# Altium PCB ELF 2 & ELF 2_Lite V1.3.PcbDoc (part 8 of 8)
Units mm, origin at the board's own origin, x right, y up, seen from the top; angles counter-clockwise.
Board outline 120 x 75 mm, 4 copper layers (01 TOP, 02 GND, 03 Signal, 04 BOT), stack 0.603 mm thick; 470 components, 412 nets, 2075 pads, 1565 vias.
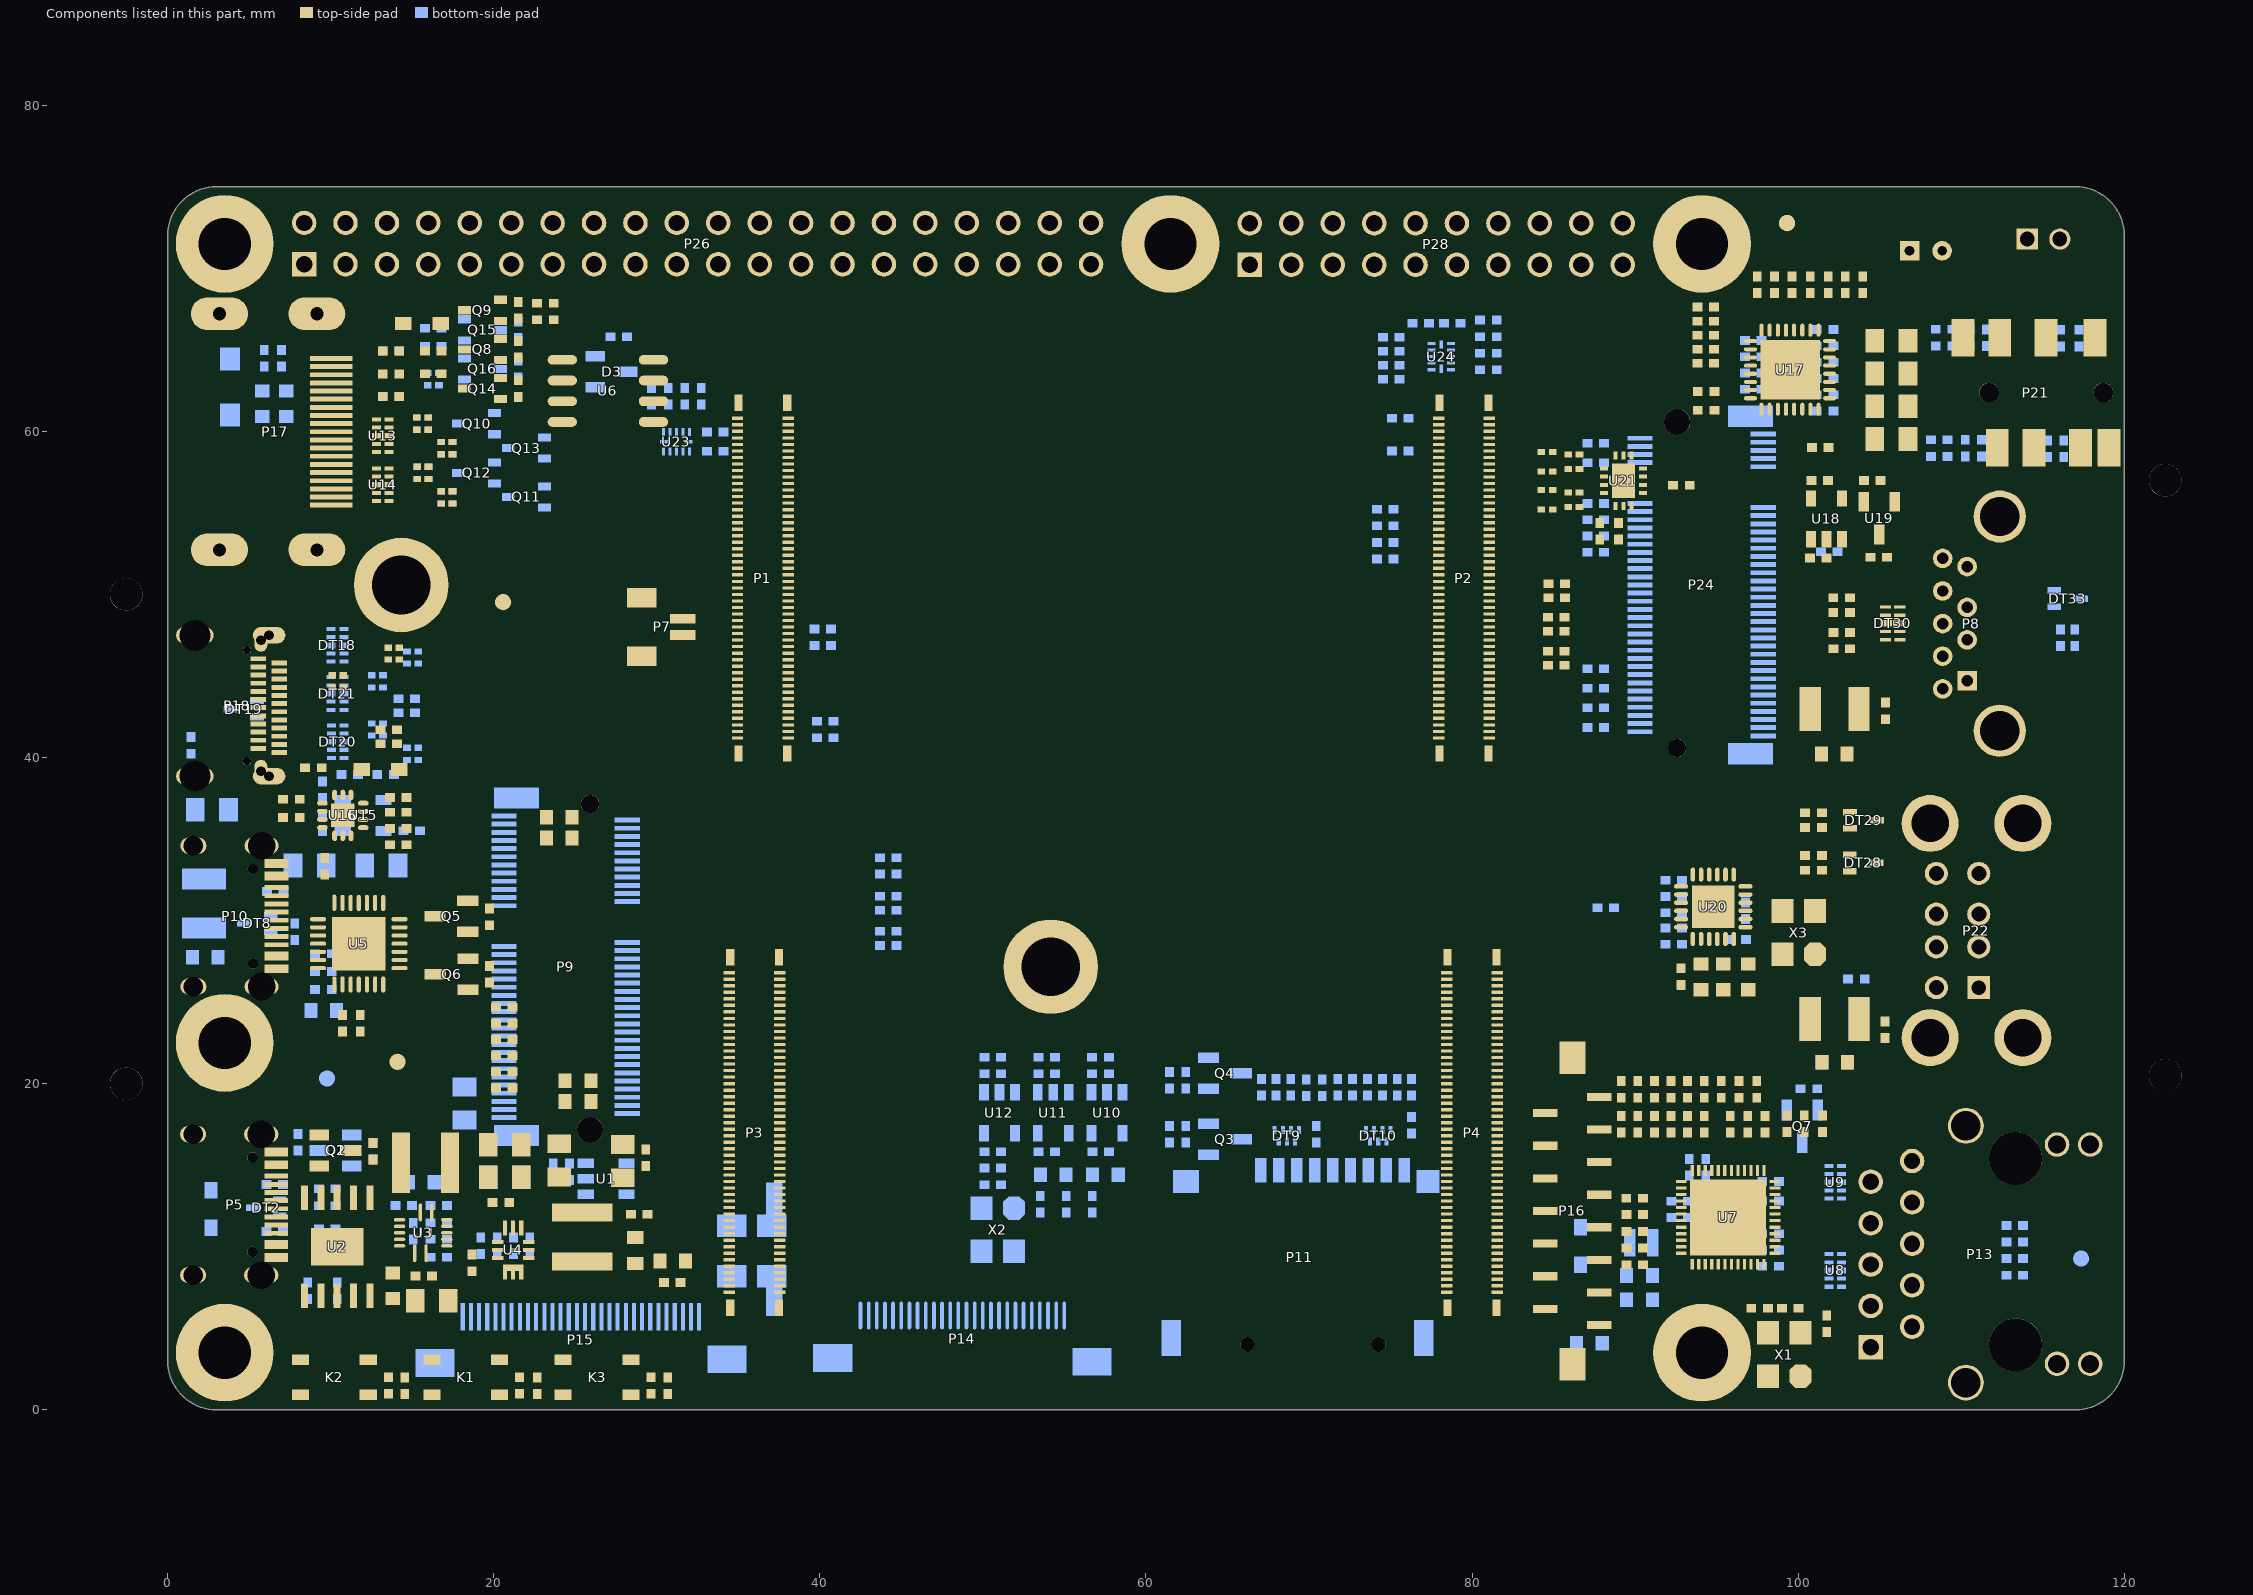
[diagram p9: the components of this part, seen from the top]

## Other copper (continued)
04 BOT:
  pour cut-out: 12.309,47.398 12.861,46.846 16.78,46.846 18.813,44.814 18.813,44.255 18.592,44.255 17.227,42.889 17.227,39.935 16.721,39.43 8.81,39.43 7.843,40.396 3.799,40.396 3.514,40.681 3.514,41.343 4.698,42.527 4.698,43.248 3.577,44.369 3.577,45.43 4.04,45.894 6.241,45.894 8.119,47.772 11.749,47.772
  pour cut-out: 41.219,4.784 50.49,4.784 50.49,6.943 48.458,8.975 48.458,11.896 47.442,12.912 47.442,15.833 46.807,16.468 45.029,16.468 41.219,12.658 41.219,6.308
  pour cut-out: 51.049,50.509 51.049,44.89 51.181,44.758 51.897,44.758 52.013,44.874 52.013,50.278 51.933,50.684 51.224,50.684
  pour cut-out: 87.663,67.495 87.17,67.987 86.873,67.987 85.451,66.566 85.451,63.489 87.663,65.7
  pour cut-out: 77.477,12.589 76.982,12.094 76.982,6.955 77.498,6.439 78.165,7.105 78.165,12.256 77.832,12.589
  pour cut-out: 21.703,59.009 21.703,58.701 22.527,57.877 23.614,57.877 23.801,58.064 23.801,59.07 23.698,59.172 21.867,59.172
  pour cut-out: 94.839,23.542 96.846,23.542 96.929,23.458 96.924,23.453 94.948,23.453
  pour cut-out: 6.25,12.483 6.25,12.29 7.269,12.29 7.269,12.419 7.204,12.483
  pour cut-out: 9.557,27.502 9.557,23.988 9.396,23.827 9.396,27.501 9.405,27.51
  pour cut-out: 6.953,29.727 6.953,29.92 6.128,29.92 6.128,29.744 6.145,29.727
  pour cut-out: 41.88,37.46 41.88,36.388 41.807,36.315 41.602,36.52 41.602,37.181
  pour cut-out: 59.309,14.986 59.309,8.89 55.118,4.699 54.61,4.699 54.61,6.731 58.674,10.795 58.674,14.986
  pour cut-out: 53.721,16.256 53.721,14.986 53.848,14.986 53.848,16.256
  pour cut-out: 53.863,17.667 54.756,17.667 54.756,17.291 54.737,17.272 53.955,17.272 53.863,17.365
  pour cut-out: 55.763,17.667 56.156,17.667 56.156,16.26 55.763,16.26
  pour cut-out: 54.356,12.7 54.356,10.922 55.88,10.922 55.88,12.7
  pour cut-out: 77.851,63.5 78.359,63.5 78.359,64.897 77.851,64.897
  pour cut-out: 30.099,59.563 30.099,59.182 31.496,59.182 31.496,59.563
  pour cut-out: 33.579,60.579 33.579,58.039 33.401,58.039 33.401,60.579
  pour cut-out: 34.036,27.559 35.687,25.908 35.687,25.4 35.306,25.019 34.925,25.019 33.274,26.67 33.274,27.432 33.401,27.559
  pour cut-out: 21.59,38.735 21.717,38.862 24.13,38.862 24.257,38.735 24.257,37.211 22.86,35.814 21.59,35.814
  pour cut-out: 22.352,23.622 22.352,23.114 22.987,23.114 22.987,23.622
  pour cut-out: 21.59,25.908 22.225,25.908 22.225,24.892 21.59,24.892
  pour cut-out: 43.195,34.29 45.293,34.29 45.293,28.194 43.195,28.194
  pour cut-out: 19.812,17.526 21.59,17.526 21.59,36.83 19.812,36.83
  pour cut-out: 80.097,55.372 80.097,54.239 80.061,54.204 82.042,54.204 82.042,55.346 82.017,55.372
  pour cut-out: 80.007,62.048 78.601,60.642 78.843,60.4 81.665,60.4 82.392,61.127 82.392,62.048
  pour cut-out: 75.361,66.777 75.361,65.974 75.555,65.78 76.206,65.78 76.206,66.919 75.855,67.27
  pour cut-out: 73.484,65.666 73.484,61.48 73.702,61.48 74.301,62.079 74.301,65.37 74.031,65.64
  pour cut-out: 10.87,6.274 10.856,6.259 10.856,6.118
  pour cut-out: 13.175,11.25 13.175,9.37 13.518,9.026 14.165,9.026 14.495,9.356 16.124,9.356 16.124,11.134 16.048,11.21
  pour cut-out: 15.749,14.607 13.5,14.607 13.482,14.588 13.5,14.571 15.733,14.571
  pour cut-out: 24.709,11.439 25.034,11.114 25.06,11.114
  pour cut-out: 98.653,60.077 98.653,58.662 98.598,58.607 96.083,58.607 96.032,58.657 96.032,59.978 96.134,60.08
  pour cut-out: 96.872,41.977 98.828,41.977 98.828,41.081 96.87,41.081
  pour cut-out: 46.604,48.955 47.594,48.955 47.594,48.904 46.604,48.904
  pour cut-out: 32.715,2.458 33.056,2.117 42.108,2.117 42.108,4.911 32.837,4.911 32.71,4.784
  pour cut-out: 54.46,4.179 54.554,4.085 54.554,1.609 57.962,1.609 58.552,2.199 58.552,4.088 58.491,4.149
  pour cut-out: 52.013,48.447 51.023,48.447
  pour cut-out: 33.726,49.996 33.726,45.678 39.06,45.678 38.986,45.752 38.986,50.049
  pour cut-out: 82.494,15.96 85.161,13.293 84.018,12.15 84.018,5.927 79.827,5.927 78.811,6.943 78.811,13.674 81.097,15.96
  pour cut-out: 89.733,4.403 89.733,5.292 89.479,5.292 89.479,4.403
  pour cut-out: 88.336,13.293 88.336,11.007 89.733,12.404 89.733,14.563
  pour cut-out: 17.978,4.784 32.837,4.784 32.837,8.721 23.185,8.721 21.026,6.562 17.978,6.562
  pour cut-out: 69.794,18.373 69.794,16.849 71.191,16.849 71.191,18.373
  pour cut-out: 73.604,17.992 73.604,16.849 74.366,16.849 74.366,17.992

## Silkscreen, mask and mechanical layers (free items; w line width, h text height)
Top Overlay:
  drawing of 2779 lines, arcs and shapes, not listed
  text "L_SPK" at 111.993,67.966 h0.76
  text "R_SPK" at 114.803,67.96 h0.76
  text "HDMI" at 0.27,50.213 h1.52
  text "USB-DP" at 0.266,48.271 h1.52
  text "ELF 2 & ELF 2_Lite" at 86.973,41.974 h1.5
  text "V1.3" at 96.229,40.023 h1.5
  text "DEBUG" at 0.263,35.366 h1.52
  text "MIPI CSI" at 83.739,23.846 h1.27
  text "PWR" at 0.259,17.616 h1.52
  text "RST" at 9.431,3.997 h1.02
  text "BOOT" at 17.089,3.997 h1.02
  text "RECOVERY" at 23.947,3.997 h1.02
Bottom Overlay:
  drawing of 2763 lines, arcs and shapes, not listed
  text "ELF 2 & ELF 2_Lite" at 75.391,26.174 h1.5
  text "V1.3" at 70.776,24.275 h1.5
  text "TF CARD" at 72.248,21.544 h1.27
  text "MIPI DSI" at 30.682,8.837 h1.27
  text "MIPI CSI" at 48.347,8.837 h1.27

## Text inside footprints (layer, text, board x,y; h text height)
M15: Bottom Overlay "QR Code" at 87.345,17.484 h0.76
M18: Top Overlay "QR Code" at 24.324,26.545 h0.76
P9: Bottom Overlay "1" at 19.354,36.536 h0.8 r90; Bottom Overlay "2" at 30.479,36.461 h0.8 r90; Bottom Overlay "74" at 30.479,18.411 h0.8 r90
P21: Mechanical 13 "此线段与板边重合" at 126.665,58.323 h0.76 r180
P24: Bottom Overlay "1" at 99.125,41.205 h0.8 r270; Bottom Overlay "2280" at 18.225,48.78 h2 r270
P26: Top Overlay "40" at 58.013,73.761 h1.5; Top Overlay "1" at 6.244,68.995 h1.5; Top Overlay "2" at 6.102,73.491 h1.5; Top Overlay "39" at 58.003,68.152 h1.5
P28: Top Overlay "20" at 90.688,73.761 h1.5; Top Overlay "19" at 90.613,68.173 h1.5; Top Overlay "2" at 64.217,73.669 h1.5; Top Overlay "1" at 64.232,68.348 h1.5
U20: Mechanical 46 "5" at 96.661,31.594 h0.25 r180; Mechanical 46 "4" at 96.661,31.094 h0.25 r180; Mechanical 46 "7" at 95.936,32.82 h0.25 r180; Mechanical 46 "16" at 92.609,30.594 h0.25 r180; Mechanical 46 "17" at 92.609,30.094 h0.25 r180; Mechanical 46 "10" at 94.334,32.82 h0.25 r180; Mechanical 46 "19" at 93.334,28.869 h0.25 r180; Mechanical 46 "9" at 94.936,32.82 h0.25 r180; Mechanical 46 "18" at 92.609,29.594 h0.25 r180; Mechanical 46 "20" at 93.834,28.869 h0.25 r180; Mechanical 46 "2" at 96.661,30.094 h0.25 r180; Mechanical 46 "23" at 95.334,28.869 h0.25 r180; Mechanical 46 "22" at 94.834,28.869 h0.25 r180; Mechanical 46 "13" at 92.609,32.094 h0.25 r180; Mechanical 46 "6" at 96.661,32.094 h0.25 r180; Mechanical 46 "11" at 93.834,32.82 h0.25 r180; Mechanical 46 "1" at 96.661,29.594 h0.25 r180; Mechanical 46 "8" at 95.436,32.82 h0.25 r180; Mechanical 46 "21" at 94.334,28.869 h0.25 r180; Mechanical 46 "24" at 95.834,28.869 h0.25 r180; Mechanical 46 "15" at 92.609,31.094 h0.25 r180; Mechanical 46 "12" at 93.334,32.82 h0.25 r180; Mechanical 46 "3" at 96.661,30.594 h0.25 r180; Mechanical 46 "14" at 92.609,31.594 h0.25 r180; Mechanical 46 "25" at 94.584,30.844 h0.25 r180